# Allegro board minicar-v2.brd
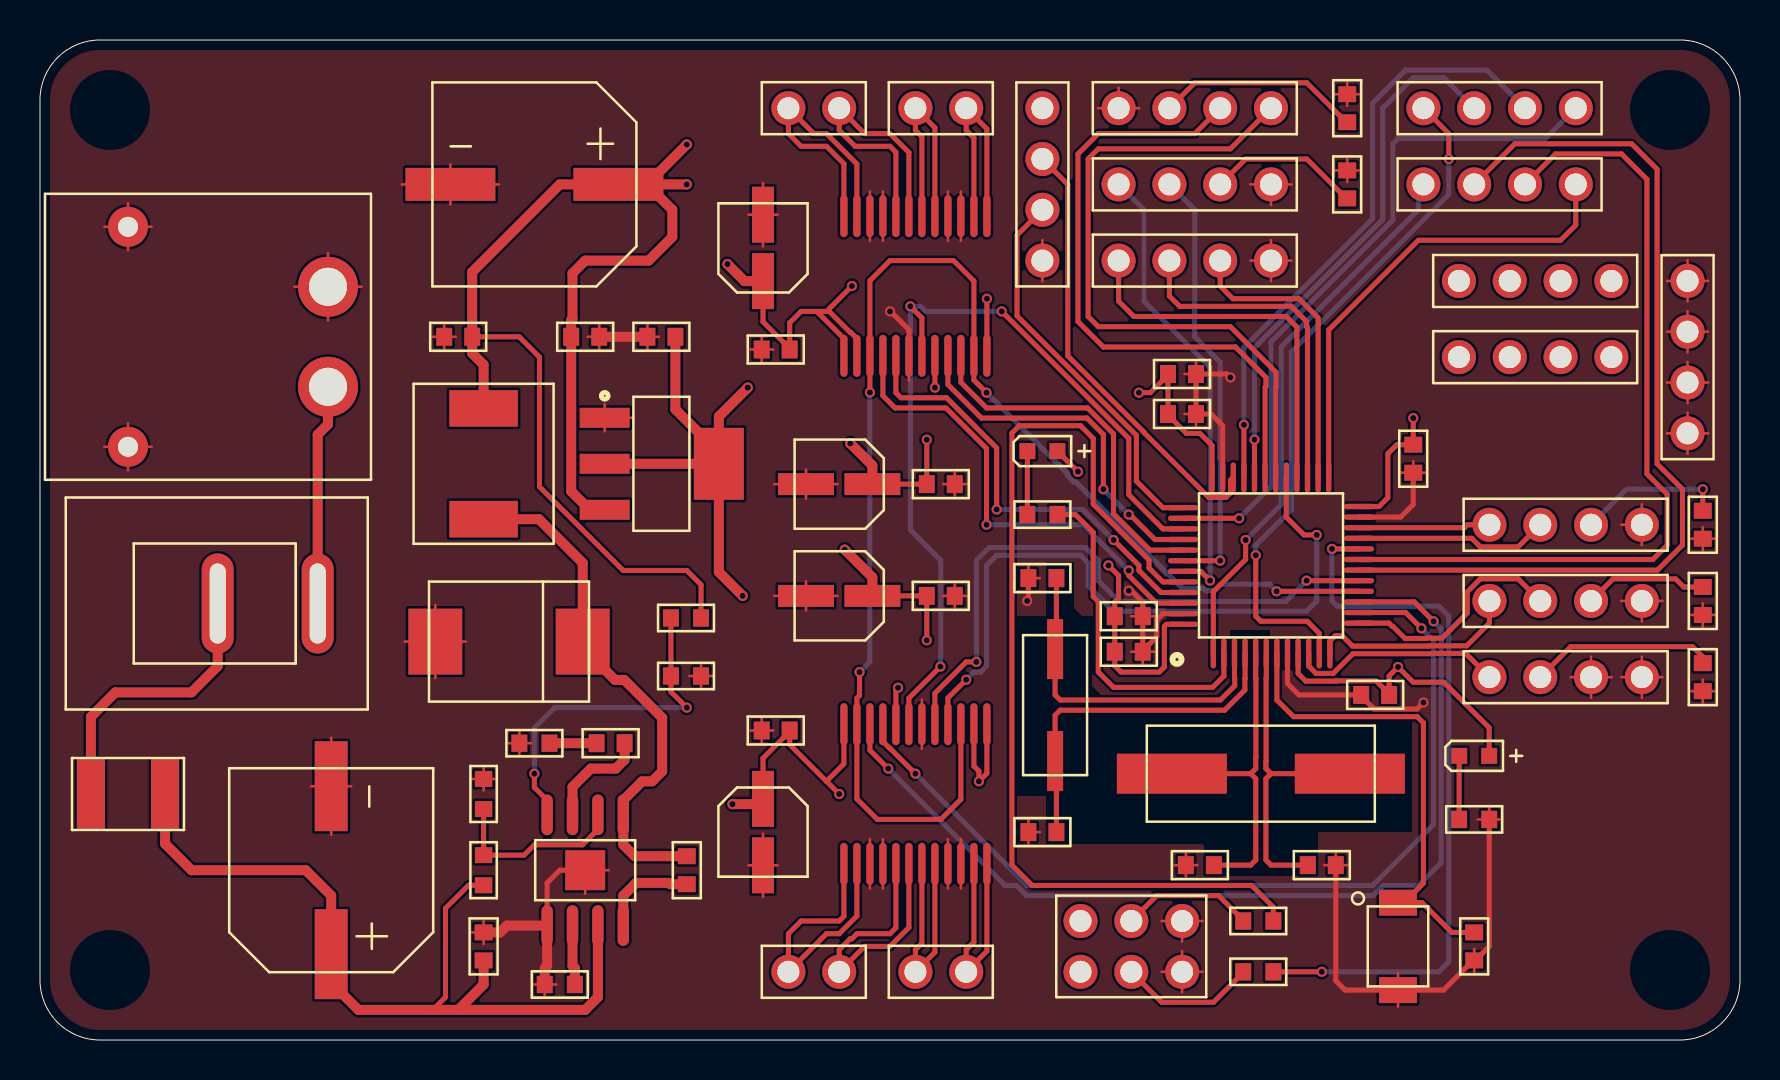
[diagram p0: board, top side]
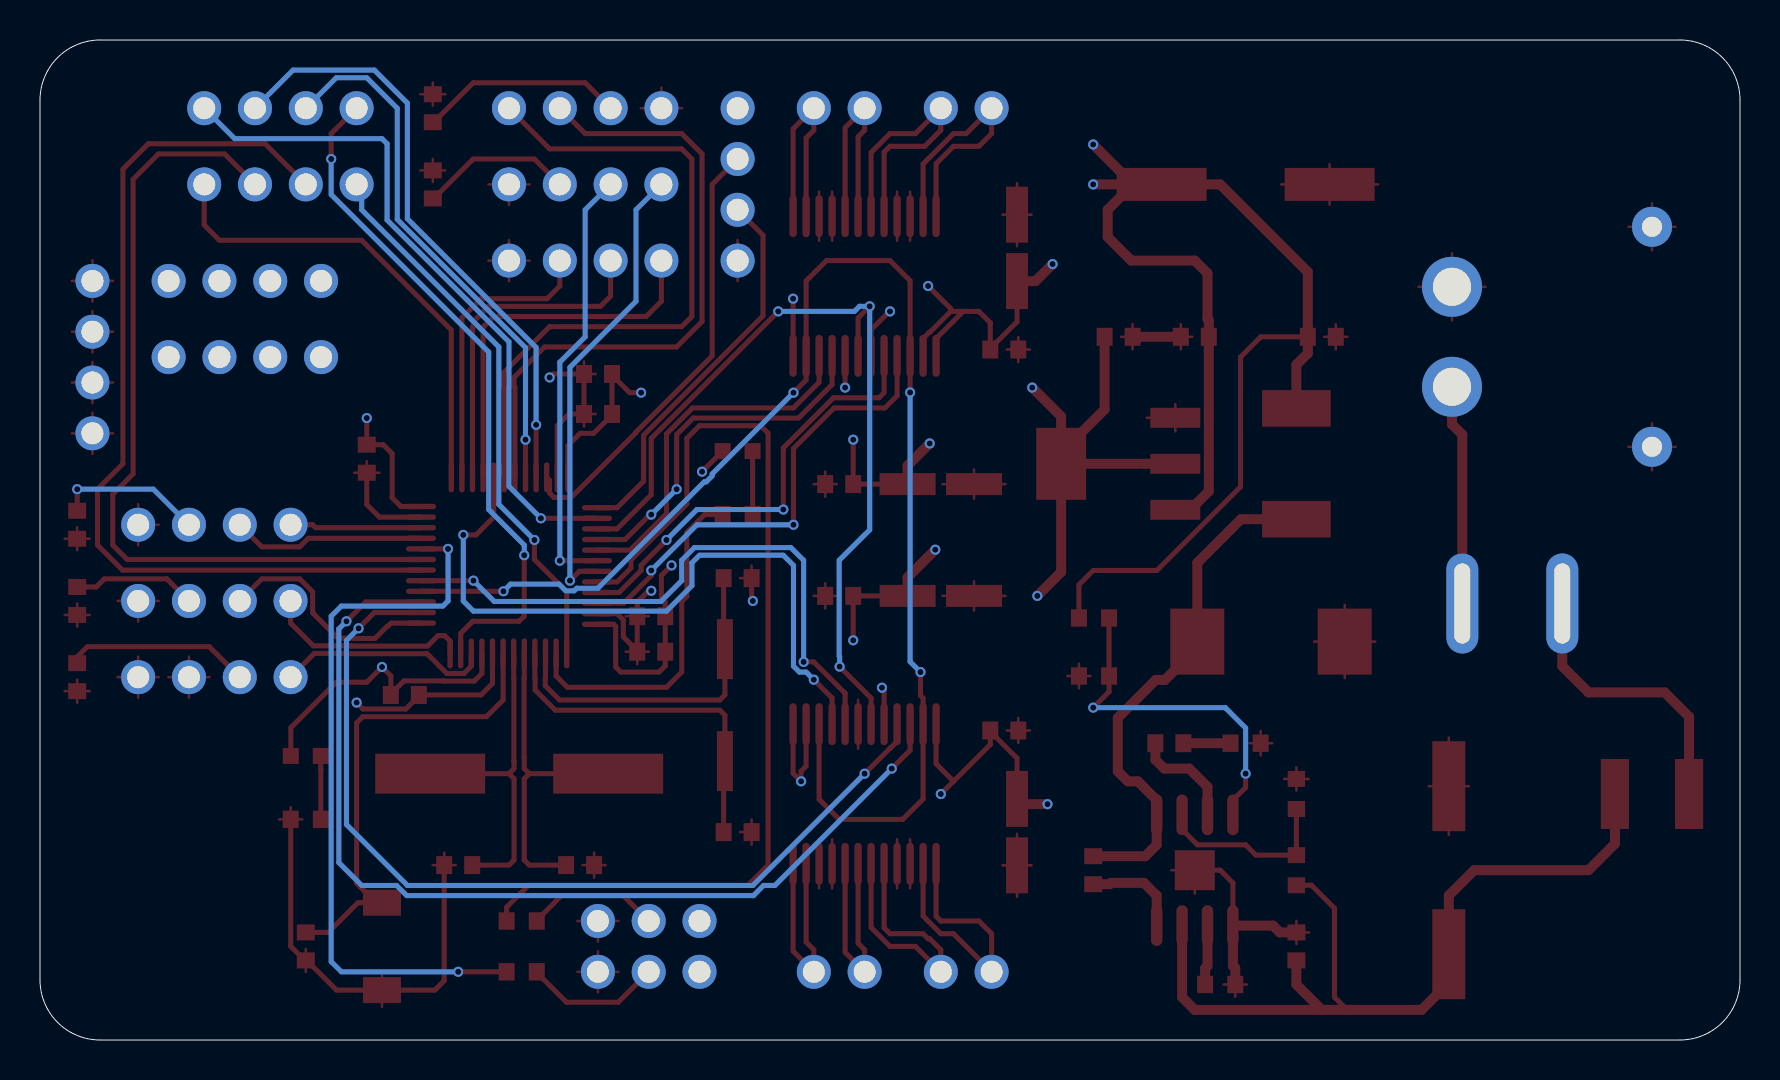
[diagram p1: board, bottom side, seen from below]

Outline 85 x 50 mm; copper layers: TOP, GND, POWER, BOTTOM. Coordinates in mm from the lower left corner of the outline.
Outline path: 0,47 0,3 arc(0.88,0.88) 3,0 82,0 arc(84.12,0.88) 85,3 85,47 arc(84.12,49.12) 82,50 3,50 arc(0.88,49.12) 0,47

## Design rules (mm)
constraint set DEFAULT: min track width 0.127
net group DP1_8MHZ: nets OSC_IN OSC_OUT
net group DP1_32KHZ: nets PC14 PC15

## Placement (name value [footprint] x y rotation side)
C1  22pF,16V  [C0603]  50.12 23.09 0 top
C2  22pF,16V  [C0603]  50.12 10.39 0 top
C3  22pF,16V  [C0603]  57.99 8.74 0 top
C4  22pF,16V  [C0603]  64.09 8.74 180 top
C5  4.7uF,16V  [C0603]  57.1 33.3 180 top
C6  100nF,16V  [C0603]  54.44 19.41 180 top
C7  100nF,16V  [C0603]  71.71 4.68 90 top
C8  100nF,16V  [C0603]  57.1 31.3 180 top
C9  10nF,16V  [C0603]  54.44 21.19 180 top
C10  1uF,16V  [C0603]  66.76 17.25 0 top
C11  100nF,16V  [C0603]  68.66 29.06 90 top
C12  100uF,50V  [C0603]  32.34 8.49 270 top
C13  220uF, 50V  [CP_D10XL10R2]  14.56 8.49 90 top
C14  10uF,50V  [C0603]  22.18 4.68 270 top
C15  22uF,50V  [C0603]  20.91 35.16 180 top
C16  220uF, 50V  [CP_D10XL10R2]  24.72 42.78 180 top
C17  150pF,50V  [C0603]  28.53 14.84 180 top
C18  4.7uF,50V  [C0603]  31.07 35.16 180 top
C19  1uF,50V  [C0603]  27.26 35.16 180 top
C20  100nF,16V  [C0603]  36.78 34.52 0 top
C21  100nF,16V  [C0603]  45.04 27.79 180 top
C22  10uF, 16V  [CP_D4XL54]  36.15 39.61 90 top
C23  10uF, 16V  [CP_D4XL54]  39.96 27.79 180 top
C24  100nF,16V  [C0603]  36.78 15.47 0 top
C25  100nF,16V  [C0603]  45.04 22.21 180 top
C26  10uF, 16V  [CP_D4XL54]  36.15 10.39 270 top
C27  10uF, 16V  [CP_D4XL54]  39.96 22.21 180 top
C28  100nF,16V  [C0603]  65.36 46.59 270 top
C29  100nF,16V  [C0603]  83.14 18.14 90 top
C30  100nF,16V  [C0603]  83.14 21.95 90 top
C31  100nF,16V  [C0603]  65.36 42.78 270 top
C32  100nF,16V  [C0603]  83.14 25.76 90 top
D1  LED  [LED0603]  71.71 14.21 0 top
D2  LED  [LED0603]  50.12 29.45 0 top
D3  SS34  [DO214AB]  23.45 19.92 180 top
F1  SMD1812-150-33 (3A)  [SMD1812]  4.4 12.3 0 top
J1  HEADER 4  [HDR4_P254]  50.12 42.78 90 top
J2  HEADER 3X2  [HDR3X2_P254]  54.56 4.68 0 top
J3  HEADER 4  [HDR4_P254]  72.98 46.59 0 top
J4  HEADER 4  [HDR4_P254]  72.98 42.78 0 top
J5  HDR_3V3  [HDR4_P254]  74.76 37.95 0 top
J6  HDR_5V  [HDR4_P254]  74.76 34.14 0 top
J7  HDR_GND  [HDR4_P254]  82.38 34.14 270 top
J8  HEADER 2  [HDR2_P254]  45.04 46.59 180 top
J9  HEADER 2  [HDR2_P254]  38.69 46.59 180 top
J10  HEADER 2  [HDR2_P254]  38.69 3.41 0 top
J11  HEADER 2  [HDR2_P254]  45.04 3.41 0 top
J12  HDR_USART1  [HDR4_P254]  57.74 46.59 180 top
J13  HDR_USART2  [HDR4_P254]  76.28 21.95 0 top
J14  HDR_SERVO  [HDR4_P254]  76.28 18.14 0 top
J15  HDR_I2C1  [HDR4_P254]  57.74 42.78 180 top
J16  HDR_I2C2  [HDR4_P254]  76.28 25.76 180 top
J17  HDR_SPI2  [HDR4_P254]  57.74 38.97 0 top
L1  10uH,3A  [H0630]  22.18 28.81 90 top
R1  10K  [R0603]  60.91 3.41 180 top
R2  10K  [R0603]  60.91 5.95 0 top
R3  510R  [R0603]  71.71 11.03 0 top
R4  510R  [R0603]  50.12 26.27 0 top
R5  100K  [R0603]  22.18 8.49 270 top
R6  100K  [R0603]  22.18 12.3 270 top
R7  100K  [R0603]  25.99 2.77 0 top
R8  210K 1%  [R0603]  32.3 21.1 180 top
R9  100K  [R0603]  24.72 14.84 0 top
R10  40R2K 1%  [R0603]  32.3 18.2 0 top
SW1  SW_PB_SPST  [SW_PB_4X3]  67.9 4.68 90 top
SW2  -  [KCD11-2P]  11.39 21.82 180 top
U1  STM32F103C8T6  [LQFP_48]  61.55 23.73 0 top
U2  -  [XT30]  4.4 35.16 90 top
U3  MP1584EN  [SOIC-8-EP]  27.26 8.49 180 top
U4  LDL1117_33R  [SOT223]  31.07 28.81 180 top
U5  TB6612FNG  [SSOP24]  43.77 37.7 180 top
U6  TB6612FNG  [SSOP24]  43.77 12.3 0 top
Y1  32.768kHz  [SMD_32KHZ]  50.76 16.74 90 top
Y2  8MHz  [SMD_8MHZ]  61.04 13.32 180 top

## Library data of the parts
C1-C12 C14 C15 C17-C21 C24 C25 C28-C32 = CAP NP
C13 C16 C22 C23 C26 C27 = CAP POL
D1 D2 = LED
D3 = DIODE
F1 = FUSE
J1 J3-J7 J12-J17 = HEADER 4
J2 = HEADER 3X2
J8-J11 = HEADER 2
L1 = INDUCTOR
R1-R10 = R2
SW1 = SW_PB_SPST
SW2 = SW SPST
U1 = STM32F103C8T6
U2 = XT30
U3 = MP1584EN
U4 = LDL1117_33R
U5 U6 = TB6612FNG
Y1 Y2 = CRYSTAL

## Footprints (pads in the part's own frame, mm; a bottom-side part is the same pattern mirrored in y, then rotated)
C0603
  rect 0.8x0.9 smd: 1(-0.7,0) 2(0.7,0)
CP_D4XL54
  rect 2.8x1.1 smd: 1(-1.66,0) 2(1.66,0)
CP_D10XL10R2
  rect 4.5x1.65 smd: 1(-4.2,0) 2(4.2,0)
DO214AB
  rect 2.7x3.3 smd: 1(-3.686,0) 2(3.686,0)
H0630
  rect 1.83x3.43 smd: 1(-2.77,0) 2(2.77,0)
HDR2_P254
  round 1.7 hole 1.1: 1(-1.27,0) 2(1.27,0)
HDR3X2_P254
  round 1.7 hole 1.1: 1(-2.54,1.27) 2(-2.54,-1.27) 3(0,1.27) 4(0,-1.27) 5(2.54,1.27) 6(2.54,-1.27)
HDR4_P254
  round 1.7 hole 1.1: 1(-3.81,0) 2(-1.27,0) 3(1.27,0) 4(3.81,0)
KCD11-2P
  oval 1.6x5 hole 0.8x4 unplated: (-2.5,0) (2.5,0)
LED0603
  rect 0.8x0.8 smd: 1(-0.749,0) 2(0.749,0)
LQFP_48
  oval 0.27x1.5 smd: 1(-2.885,-4.4) 2(-2.355,-4.4) 3(-1.825,-4.4) 4(-1.295,-4.4) 5(-0.765,-4.4) 6(-0.235,-4.4) 7(0.295,-4.4) 8(0.825,-4.4) 9(1.355,-4.4) 10(1.885,-4.4) 11(2.415,-4.4) 12(2.945,-4.4) 25(2.885,4.4) 26(2.355,4.4) 27(1.825,4.4) 28(1.295,4.4) 29(0.765,4.4) 30(0.235,4.4) 31(-0.295,4.4) 32(-0.825,4.4) 33(-1.355,4.4) 34(-1.885,4.4) 35(-2.415,4.4) 36(-2.945,4.4)
  oval 1.5x0.27 smd: 13(4.4,-2.885) 14(4.4,-2.355) 15(4.4,-1.825) 16(4.4,-1.295) 17(4.4,-0.765) 18(4.4,-0.235) 19(4.4,0.295) 20(4.4,0.825) 21(4.4,1.355) 22(4.4,1.885) 23(4.4,2.415) 24(4.4,2.945) 37(-4.4,2.885) 38(-4.4,2.355) 39(-4.4,1.825) 40(-4.4,1.295) 41(-4.4,0.765) 42(-4.4,0.235) 43(-4.4,-0.295) 44(-4.4,-0.825) 45(-4.4,-1.355) 46(-4.4,-1.885) 47(-4.4,-2.415) 48(-4.4,-2.945)
R0603
  rect 0.8x0.87 smd: 1(-0.753,0) 2(0.753,0)
SMD1812
  rect 1.407x3.499 smd: 1(-1.853,0) 2(1.853,0)
SMD_8MHZ
  rect 5.5x2 smd: 1(-4.45,0) 2(4.45,0)
SMD_32KHZ
  rect 3x0.8 smd: 1(-2.8,0) 2(2.8,0)
SOIC-8-EP
  oval 0.574x2.038 smd: 1(-1.905,-2.769) 2(-0.635,-2.769) 3(0.635,-2.769) 4(1.905,-2.769) 5(1.905,2.769) 6(0.635,2.769) 7(-0.635,2.769) 8(-1.905,2.769)
  rect 2x2 smd: 9(0,0)
SOT223
  rect 2.5x1 smd: 1(2.835,-2.3) 2(2.835,0) 3(2.835,2.3)
  rect 2.5x3.6 smd: 4(-2.873,0)
SSOP24
  oval 0.37x2.1 smd: 1(-3.575,-3.491) 2(-2.925,-3.491) 3(-2.275,-3.491) 4(-1.625,-3.491) 5(-0.975,-3.491) 6(-0.325,-3.491) 7(0.325,-3.491) 8(0.975,-3.491) 9(1.625,-3.491) 10(2.275,-3.491) 11(2.925,-3.491) 12(3.575,-3.491) 13(3.575,3.491) 14(2.925,3.491) 15(2.275,3.491) 16(1.625,3.491) 17(0.975,3.491) 18(0.325,3.491) 19(-0.325,3.491) 20(-0.975,3.491) 21(-1.625,3.491) 22(-2.275,3.491) 23(-2.925,3.491) 24(-3.575,3.491)
SW_PB_4X3
  rect 1.3x1.9 smd: 1(-2.185,0) 2(2.185,0)
XT30
  round 3 hole 1.9: 1(2.5,-10) 2(-2.5,-10)
  round 2 hole 1: 3(5.5,0) 4(-5.5,0)

## Nets
GND: C1.1 C2.1 C3.1 C4.1 C5.1 C6.1 C7.1 C8.1 C9.1 C10.1 C11.1 C13.2 C14.1 C15.2 C16.2 C18.2 C19.1 C20.1 C21.1 C22.2 C23.2 C24.1 C25.1 C26.2 C27.2 C28.1 C29.1 C30.1 C31.1 C32.1 D3.2 J1.1 J2.5 J2.6 J7.1 J7.2 J7.3 J7.4 J12.4 J13.4 J14.3 J14.4 J15.1 J16.1 J17.4 R3.2 R6.1 R7.1 R9.1 R10.2 SW1.1 U1.8 U1.23 U1.35 U1.47(VSS_3) U2.1 U2.3 U2.4 U3.5 U3.9 U4.1 U5.3 U5.4 U5.9 U5.10 U5.18 U6.3 U6.4 U6.9 U6.10 U6.18
VBAT: J4.1 U1.1
VCC3V3: C5.2 C6.2 C8.2 C9.2 C10.2 C11.2 C18.1 C30.2 C31.2 C32.2 D1.2 D2.2 J1.4 J2.1 J2.2 J5.1 J5.2 J5.3 J5.4 J13.3 J15.2 J16.2 U1.9 U1.24 U1.36 U1.48 U4.2 U4.4(VOUT2)
VCC5V: C15.1 C16.1 C19.2 C20.2 C21.2 C22.1 C23.1 C24.2 C25.2 C26.1 C27.1 C28.2 C29.2 J6.1 J6.2 J6.3 J6.4 J12.3 J14.2 L1.2 R8.1 U4.3 U5.13 U5.14(VM3) U5.20 U5.24 U6.13 U6.14(VM3) U6.20 U6.24
VIN_BAT: C13.1 C14.2 F1.2 R5.2 U3.7(VIN)
BOOT0: R2.2 U1.44
BOOT1: R1.1 U1.20
I2C1_SCL: J15.3 U1.42
I2C1_SDA: J15.4 U1.43
I2C2_SCL: J16.3 U1.21
I2C2_SDA: J16.4 U1.22
MOTORIC1_AIN1: U1.40 U5.21
MOTORIC1_AIN2: U1.41 U5.22
MOTORIC1_BIN1: U1.45 U5.17
MOTORIC1_BIN2: U1.46 U5.16
MOTORIC2_AIN1: U1.14 U6.21
MOTORIC2_AIN2: U1.15 U6.22
MOTORIC2_BIN1: U1.17 U6.17
MOTORIC2_BIN2: U1.29 U6.16
MOTORIC_STBY: U1.39 U5.19 U6.19
OSC_IN: C3.2 U1.5 Y2.2
OSC_OUT: C4.2 U1.6 Y2.1
PA1: J3.1 U1.11
PA11: J3.2 U1.32
PA12: J3.3 U1.33
PA15: J3.4 U1.38
PB0: J4.2 U1.18
PB1: J4.3 U1.19
PB12: J4.4 U1.25
PC13: R4.2 U1.2
PC14: C1.2 U1.3 Y1.2
PC15: C2.2 U1.4 Y1.1
RESET: C7.2 SW1.2 U1.7
SPI2_MISO: J17.2 U1.27
SPI2_MOSI: J17.1 U1.28
SPI2_SCK: J17.3 U1.26
SWCLK: J1.2 U1.37
SWDIO: J1.3 U1.34
TIM2_PWM: J14.1 U1.10
TIM3_PWM: U1.16 U5.15 U5.23 U6.15 U6.23
USART1_RX: J12.2 U1.31
USART1_TX: J12.1 U1.30
USART2_RX: J13.2 U1.13
USART2_TX: J13.1 U1.12
N13546: J8.1 U5.1 U5.2
N13563: J8.2 U5.5 U5.6
N13598: J9.1 U5.7 U5.8
N13619: J9.2 U5.11 U5.12
N15223: J10.1 U6.1 U6.2
N15263: J10.2 U6.5 U6.6
N15407: J11.1 U6.7 U6.8
N15519: J11.2 U6.11 U6.12
N31972: C12.2 U3.8
N31979: C12.1 D3.1(K) L1.1 U3.1
N32592: R7.2 U3.6
N32821: R5.1 R6.2 U3.2
N35796: C17.1 U3.3
N36210: C17.2 R9.2
N38494: R8.2 R10.1 U3.4
N053341: J2.4 R1.2
N053344: J2.3 R2.1
N066431: D1.1(CATHODE) R3.1
N066591: D2.1(CATHODE) R4.1
N113201: U2.2
N288331: F1.1

## Via types
v1: diameter 0.508, hole 0.305, TOP to BOTTOM, 60 vias

## Routing (per net, layer and track width the routed paths; a pad name or vN(x,y) marks a point on that pad's centre or on a via; arc(x,y) is an arc through that point)
GND: length 335.5
  TOP w0.127: 67.9,1.67 SW1.1 67.9,3.32 ; 45.16,27.79 C21.1 ; C21.1 45.74,28.42 ; C21.1 45.74,27.17 ; C21.1 46.32,27.79 ; 82.38,31.85 J7.3 ; J7.3 82.38,33.9 ; J7.3 81.35,32.87 ; J7.3 83.41,32.87 ; 45.4,10.04 U6.9 45.4,7.58 ; C19.1 27.96,35.79 ; C19.1 27.96,34.53 ; C19.1 27.38,35.16 ; 23.39,14.84 R9.1 ; R9.1 23.97,15.45 ; R9.1 23.97,14.23 ; R9.1 24.55,14.84 ; 50.12,40 J1.1 50.12,37.94 ; J7.4 83.41,30.33 ; J7.4 81.35,30.33 ; J7.4 82.38,29.31 ; J7.4 82.38,31.36 ; C6.1 55.72,19.41 ; C6.1 55.14,18.78 ; C6.1 54.56,19.41 ; 61.55,41.75 J15.1 ; J15.1 62.58,42.78 ; J15.1 60.52,42.78 ; C20.1 36.66,34.52 ; C20.1 35.51,34.52 ; C20.1 36.09,33.9 ; C20.1 36.09,35.15 ; C11.1 69.29,28.36 ; C11.1 68.66,28.94 ; C11.1 68.03,28.36 ; 18.24,19.92 D3.2 ; D3.2 19.76,18.09 ; D3.2 19.76,21.75 ; D3.2 21.29,19.92 ; 56.08,3.41 J2.6 ; J2.6 58.13,3.41 ; J2.6 57.11,2.38 ; J2.6 57.11,4.44 ; 43.45,32.98 U5.18 ; 36.15,7.16 C26.2 ; C26.2 36.15,10.31 ; C26.2 35.42,8.73 ; C26.2 36.88,8.73 ; 32.48,18.2 R10.2 ; R10.2 33.05,18.81 ; R10.2 33.63,18.2 ; R10.2 33.05,17.59 ; 41.49,39.96 U5.10 41.49,42.42 ; 82.38,36.93 J7.1 ; J7.1 81.35,37.95 ; J7.1 83.41,37.95 ; J7.1 82.38,38.98 ; 54.56,21.19 C9.1 55.72,21.19 ; C2.1 49.42,11.02 ; C2.1 50,10.39 ; C2.1 49.42,9.77 ; 57.22,31.3 C8.1 57.8,30.67 ; C15.2 20.21,35.79 ; C15.2 20.21,34.53 ; C15.2 19.63,35.16 ; C15.2 20.79,35.16 ; 57.8,33.93 C5.1 57.22,33.3 ; 80.09,24.73 J16.1 ; J16.1 79.06,25.76 ; J16.1 80.09,26.79 ; 41.49,7.58 U6.3 41.49,10.04 ; 64.21,8.74 C4.1 ; C4.1 64.79,9.37 ; C4.1 65.37,8.74 ; 22.18,12.47 R6.1 ; R6.1 21.57,13.05 ; R6.1 22.79,13.05 ; R6.1 22.18,13.63 ; C16.2 22.95,42.78 ; C16.2 20.52,41.78 ; C16.2 18.09,42.78 ; C16.2 20.52,43.78 ; 71.71,4.56 C7.1 71.71,3.4 ; 3.22,29.66 U2.4 ; U2.4 5.58,29.66 ; U2.4 4.4,28.48 ; U2.4 4.4,30.84 ; C14.1 22.18,5.96 ; C14.1 22.18,4.8 ; C14.1 21.55,5.38 ; 14.56,10.26 C13.2 ; C13.2 15.56,12.69 ; C13.2 13.56,12.69 ; C13.2 14.56,15.12 ; C22.2 36.15,42.84 ; C22.2 35.42,41.27 ; C22.2 36.15,39.69 ; C22.2 36.88,41.27 ; 57.29,8.12 C3.1 ; C3.1 57.29,9.37 ; C3.1 57.87,8.74 ; C3.1 56.72,8.74 ; 82.51,25.06 C32.1 ; C32.1 83.14,24.48 ; C32.1 83.14,25.64 ; C32.1 83.77,25.06 ; 42.15,42.42 42.15,39.96 ; 25.24,2.16 R7.1 ; R7.1 24.66,2.77 ; R7.1 25.82,2.77 ; R3.2 72.46,11.64 ; R3.2 71.89,11.03 ; R3.2 73.04,11.03 ; J17.4 62.58,38.97 ; J17.4 61.55,37.94 ; J17.4 61.55,40 ; J17.4 60.52,38.97 ; 14.4,35.98 U2.1 ; U2.1 14.4,39.34 ; U2.1 16.08,37.66 ; U2.1 12.72,37.66 ; 77.55,17.11 J14.3 ; J14.3 78.58,18.14 ; J14.3 77.55,19.17 ; J14.3 76.52,18.14 ; J14.4 81.12,18.14 ; J14.4 80.09,17.11 ; J14.4 80.09,19.17 ; J14.4 79.06,18.14 ; 38.3,27.07 C23.2 ; C23.2 39.88,27.79 ; C23.2 36.72,27.79 ; C23.2 38.3,28.52 ; 49.42,23.72 C1.1 50,23.09 ; 45.16,22.21 C25.1 ; C25.1 46.32,22.21 ; C25.1 45.74,21.58 ; C25.1 45.74,22.83 ; C30.1 83.77,21.25 ; C30.1 83.14,21.83 ; C30.1 82.51,21.25 ; C30.1 83.14,20.67 ; C24.1 36.66,15.47 ; C24.1 36.09,16.1 ; C24.1 35.51,15.47 ; C24.1 36.09,14.85 ; 46.05,10.04 U6.10 46.05,7.58 ; C18.2 30.37,35.79 ; C18.2 30.95,35.16 ; C18.2 30.37,34.53 ; C29.1 83.77,17.44 ; C29.1 83.14,16.86 ; C29.1 83.14,18.02 ; C29.1 82.51,17.44 ; J7.2 83.41,35.41 ; J7.2 82.38,36.44 ; J7.2 81.35,35.41 ; J7.2 82.38,34.39 ; 64.73,43.48 C31.1 ; C31.1 65.36,42.9 ; C31.1 65.99,43.48 ; C31.1 65.36,44.06 ; 46.05,39.96 46.05,42.42 ; J12.4 53.93,47.62 ; J12.4 52.9,46.59 ; J12.4 54.96,46.59 ; J13.4 81.12,21.95 ; J13.4 80.09,20.92 ; J13.4 79.06,21.95 ; U4.1 28.23,31.79 ; U4.1 28.23,30.43 ; U4.1 29.66,31.11 ; 65.36,46.71 C28.1 ; C28.1 65.99,47.29 ; C28.1 65.36,47.87 ; C28.1 64.73,47.29 ; 56.08,5.95 J2.5 ; J2.5 58.13,5.95 ; J2.5 57.11,4.92 ; 4.4,39.48 U2.3 ; U2.3 3.22,40.66 ; U2.3 5.58,40.66 ; U2.3 4.4,41.84 ; 36.72,22.21 C27.2 ; C27.2 38.3,21.48 ; C27.2 39.88,22.21 ; C27.2 38.3,22.93 ; 44.09,14.56 U6.18 44.09,17.02 ; 42.15,7.58 U6.4 42.15,10.04 ; 28.44,8.49 U3.9 27.26,7.31 ; 45.4,39.96 U5.4 45.4,42.42
  TOP w0.254: U1.23 68.03,26.14 68.66,26.78 C11.1 ; U5.18 43.45,35.51 42.53,36.43 v1(42.5,36.43) ; U1.35 59.14,30.72 58.55,31.3 C8.1 C5.1 59.35,33.3 v1(59.52,33.13) ; 55.14,19.46 C9.1 55.14,21.89 54.57,22.46 v1(54.44,22.46) ; 55.14,19.46 C6.1 ; 55.14,19.46 55.84,20.16 55.84,21 56.15,21.32 U1.47 ; v1(49.36,21.95) 49.42,22.01 C1.1 ; U3.9 25.99,8.49 25.36,7.86 U3.5 ; R3.2 72.46,4.68 71.76,3.98 C7.1 71.66,3.98 70.17,2.5 SW1.1 65.26,2.5 64.79,2.96 C4.1 ; U1.8 62.38,17.82 62.95,17.25 66.06,17.25 66.06,17.2 66.71,16.55 68.85,16.55 v1(69.17,16.87)
  TOP w0.5: C19.1 C18.2 ; R7.1 25.24,3.59 25.36,3.7 U3.5 23.35,5.72 23.01,5.38 C14.1
  GND w0.127: J7.3 83.41,32.87 ; J7.3 82.38,33.9 ; J7.3 81.35,32.87 ; J7.3 82.38,31.85 ; U2.4 5.58,29.66 ; U2.4 3.22,29.66 ; U2.4 4.4,30.84 ; U2.4 4.4,28.48 ; 80.09,20.92 J13.4 ; J13.4 81.12,21.95 ; J13.4 80.09,22.98 ; J13.4 79.06,21.95 ; U2.3 5.58,40.66 ; U2.3 4.4,41.84 ; U2.3 4.4,39.48 ; U2.3 3.22,40.66 ; J7.4 82.38,31.36 ; J7.4 81.35,30.33 ; J7.4 82.38,29.31 ; J7.4 83.41,30.33 ; 61.55,41.75 J15.1 ; J15.1 60.52,42.78 ; J15.1 62.58,42.78 ; J15.1 61.55,43.81 ; J7.1 83.41,37.95 ; J7.1 81.35,37.95 ; J7.1 82.38,38.98 ; J7.1 82.38,36.93 ; U2.1 14.4,39.34 ; U2.1 16.08,37.66 ; U2.1 14.4,35.98 ; U2.1 12.72,37.66 ; 61.55,37.94 J17.4 ; J17.4 62.58,38.97 ; J17.4 61.55,40 ; J17.4 60.52,38.97 ; J7.2 82.38,36.44 ; J7.2 82.38,34.39 ; J7.2 81.35,35.41 ; J7.2 83.41,35.41 ; J2.5 57.11,6.98 ; J2.5 58.13,5.95 ; J2.5 57.11,4.92 ; J2.5 56.08,5.95 ; 79.06,18.14 J14.4 ; J14.4 80.09,17.11 ; J14.4 81.12,18.14 ; J14.4 80.09,19.17 ; J16.1 80.09,26.79 ; J16.1 81.12,25.76 ; J16.1 80.09,24.73 ; J16.1 79.06,25.76 ; 76.52,18.14 J14.3 ; J14.3 78.58,18.14 ; J14.3 77.55,19.17 ; J14.3 77.55,17.11 ; J12.4 54.96,46.59 ; J12.4 53.93,47.62 ; J12.4 53.93,45.56 ; J12.4 52.9,46.59 ; 49.09,38.97 J1.1 ; J1.1 50.12,40 ; J1.1 50.12,37.94 ; J1.1 51.15,38.97 ; J2.6 57.11,4.44 ; J2.6 57.11,2.38 ; J2.6 58.13,3.41 ; J2.6 56.08,3.41
  GND w0.254: v1(69.17,16.87) 69.17,18.14 ; v1(42.5,36.43) 42.5,37.19 ; v1(49.36,21.95) 47.83,21.95 ; v1(59.52,33.13) 59.52,32.11
VBAT: length 27.8
  TOP w0.254: v1(60.28,25) 60.28,24.03 58.66,22.41 U1.1
  BOTTOM w0.254: J4.1 68.92,42.53 68.92,41.51 62.06,34.65 62.06,26.78 v1(60.28,25)
VCC3V3: length 256.2
  TOP w0.254: v1(54.95,32.37) 55.52,32.37 56.4,33.25 ; 56.4,33.25 C8.2 56.4,31.25 57.32,30.33 57.99,30.33 58.61,29.72 U1.36 ; 56.4,33.25 C5.2 ; D1.2 72.46,15.62 70.19,17.89 68.66,17.89 v1(67.9,18.65) 67.46,18.21 67.46,17.3 ; 67.46,17.3 66.8,17.96 64.83,17.96 64.81,17.95 63.29,17.95 62.91,18.33 U1.9 ; 67.46,17.3 C10.2 ; v1(68.66,31.1) C11.2 67.84,29.76 67.39,29.32 67.39,27.11 66.95,26.68 65.95,26.68 ; v1(53.42,23.73) 53.93,23.22 53.93,22.09 53.74,21.89 C9.2 C6.2 53.74,18.71 54.05,18.4 55.96,18.4 56.22,18.65 56.22,20.68 56.32,20.79 U1.48 ; J13.3 78.66,23.06 81.78,23.06 82.19,22.65 C30.2 ; D2.2 v1(51.9,28.42) ; J15.2 60.28,44.05 63.34,44.05 65.31,42.08 C31.2 ; C32.2 v1(83.14,27.54)
  TOP w0.5: U4.2 U4.4 ; U4.4 33.94,23.4 v1(35.13,22.21) ; U4.4 33.94,29.36 ; C18.1 31.77,31.53 33.94,29.36 ; 33.94,29.36 33.94,31.18 v1(35.39,32.62)
  POWER w0.254: 54.18,33.89 54.95,33.13 v1(54.95,32.37) ; v1(68.66,31.1) 68.66,31.86 66.63,33.89 ; v1(51.9,28.42) 51.9,31.86 49.87,33.89
  POWER w0.5: 62.31,33.89 49.1,33.89 ; 62.31,33.89 63.84,35.41 63.84,40.24 63.33,40.75 61.04,40.75 J15.2 ; 62.31,33.89 66.88,33.89 ; v1(53.42,23.73) 52.15,25 42.68,25 41.03,23.35 36.28,23.35 v1(35.13,22.21) 38.44,18.9 38.44,7.73 39.2,6.97 51.01,6.97 J2.1 J2.2 ; 49.1,33.89 36.66,33.89 v1(35.39,32.62) ; 49.1,33.89 51.64,36.43 51.64,45.07 J1.4 ; 66.88,33.89 J5.1 J5.2 J5.3 J5.4 ; 66.88,33.89 68.41,33.89 70.44,31.86 76.28,31.86 77.55,30.59 J16.2 J13.3 75.77,20.17 72.22,20.17 70.69,18.65 v1(67.9,18.65)
  BOTTOM w0.254: v1(83.14,27.54) 79.33,27.54 J16.2
VCC5V: length 312.6
  TOP w0.254: 37.48,15.43 37.48,14.77 39.32,12.94 ; 37.48,15.43 C24.2 ; 37.48,15.43 36.15,14.09 C26.1 ; U5.14 40.84,35.07 40.53,35.38 40.51,35.38 39.46,36.43 ; v1(47.34,37.06) 47.34,34.21 ; 38.84,36.43 40.2,35.07 40.2,34.21 ; 38.84,36.43 39.46,36.43 ; 38.84,36.43 38.05,36.43 37.48,35.86 37.48,34.58 ; C15.1 23.96,35.16 24.97,34.14 24.97,27.66 29.16,23.48 32.34,23.48 33.05,22.76 R8.1 ; J14.2 76.54,19.67 82.63,19.67 83.14,19.16 C29.2 ; 39.46,36.43 39.46,36.56 v1(40.59,37.7) ; C28.2 65.31,45.89 63.34,47.86 57.74,47.86 J12.3 ; 47.34,15.79 47.34,13.34 v1(46.95,12.94) 46.95,13.44 46.7,13.69 U6.14 ; 39.32,12.94 39.33,12.94 v1(39.96,12.3) ; 39.32,12.94 40.2,13.81 U6.24 ; v1(44.34,30.02) C21.2 C23.1 ; C27.1 C25.2 v1(44.34,19.98) ; U6.20 42.8,17.51 v1(42.9,17.61) ; 37.48,34.58 36.15,35.91 C22.1 ; 37.48,34.58 C20.2 ; v1(44.74,32.62) U5.20
  TOP w0.5: 30.34,42.78 v1(32.34,44.77) ; 30.34,42.78 C16.1 25.99,42.78 21.61,38.4 C15.1 21.61,34.33 22.18,33.76 L1.2 ; 30.34,42.78 v1(32.34,42.78) ; 30.34,42.78 31.62,41.51 31.62,40.15 30.44,38.97 27.26,38.97 26.62,38.34 26.62,36.05 26.56,35.99 C19.2 26.56,27.43 27.48,26.51 U4.3 ; C26.1 35.89,11.79 v1(34.63,11.79) ; C23.1 41.62,28.72 v1(40.52,29.83) ; C27.1 41.62,23.13 v1(40.24,24.52) ; v1(34.37,38.8) 35.22,37.95 C22.1
  POWER w0.254: v1(47.34,37.06) 46.71,37.7 v1(40.59,37.7) ; v1(46.95,12.94) 46.31,12.3 v1(39.96,12.3) ; v1(44.74,32.62) 44.34,32.22 v1(44.34,30.02) ; v1(44.34,19.98) 44.34,19.05 v1(42.9,17.61)
  POWER w0.5: 33.36,32.37 35.9,29.83 v1(40.52,29.83) ; 33.36,32.37 33.36,39.73 ; 33.36,32.37 33.36,26.02 ; v1(34.37,38.8) 34.29,38.8 33.36,39.73 ; 54.7,48.37 77.3,48.37 78.82,46.84 78.82,41.26 80.09,39.99 80.09,35.67 79.84,35.41 ; 54.7,48.37 55.2,47.87 55.2,47.86 J12.3 ; 54.7,48.37 35.93,48.37 v1(32.34,44.77) ; 33.36,39.73 33.36,41.76 v1(32.34,42.78) ; 79.84,35.41 J6.4 J6.3 J6.2 J6.1 ; 79.84,35.41 79.84,30.59 81.87,28.56 81.87,16.87 80.85,15.86 77.3,15.86 J14.2 ; 33.36,26.02 33.36,13.06 v1(34.63,11.79) ; 33.36,26.02 34.86,24.52 v1(40.24,24.52)
VIN_BAT: length 44.7
  TOP w0.254: R5.2 21.43,7.74 20.27,6.59 20.27,2.14 19.64,1.5
  TOP w0.5: 20.91,1.5 15.92,1.5 14.56,2.86 C13.1 14.56,7.22 13.29,8.49 7.58,8.49 6.25,9.81 F1.2 ; 20.91,1.5 27.26,1.5 27.89,2.14 U3.7 ; 20.91,1.5 22.18,2.77 C14.2
BOOT0: length 50.3
  TOP w0.254: R2.2 61.67,6.64 60.58,7.73 49.61,7.73 48.6,8.74 48.6,30.34 48.97,30.71 52.02,30.71 52.66,30.08 52.66,26.79 55.45,24 55.45,23.6 56.15,22.91 57.15,22.91
BOOT1: length 36.4
  TOP w0.254: v1(64.6,24.55) 65.95,24.55 ; R1.1 v1(64.09,3.41)
  BOTTOM w0.254: v1(64.09,3.41) 69.93,3.41 70.44,3.92 70.44,21.19 69.93,21.7 64.85,21.7 64.6,21.95 v1(64.6,24.55)
I2C1_SCL: length 21.7
  TOP w0.254: U1.42 v1(59.01,23.96)
  BOTTOM w0.254: v1(59.01,23.96) 59.01,33.89 57.74,35.16 57.74,41.51 J15.3
I2C1_SDA: length 23.3
  TOP w0.254: v1(58.5,22.97) 58.03,23.43 U1.43
  BOTTOM w0.254: J15.4 55.2,41.51 55.2,36.94 58.5,33.64 v1(58.5,22.97)
I2C2_SCL: length 9.7
  TOP w0.254: J16.3 73.91,24.66 72.01,24.66 71.59,25.09 U1.21
I2C2_SDA: length 6.6
  TOP w0.254: J16.4 71.37,25.76 71.22,25.61 U1.22
MOTORIC1_AIN1: length 18
  TOP w0.254: v1(54.44,26.27) 54.56,26.14 54.63,26.14 55.74,25.02 U1.40 ; v1(53.17,27.54) 53.17,30.27 52.34,31.1 47.07,31.1 45.4,32.77 45.4,34.21
  BOTTOM w0.254: v1(53.17,27.54) v1(54.44,26.27)
MOTORIC1_AIN2: length 18.2
  TOP w0.254: U5.22 46.05,32.88 47.33,31.6 52.38,31.6 53.68,30.3 53.68,26.31 55.49,24.5 U1.41
MOTORIC1_BIN1: length 22.3
  TOP w0.254: 42.8,34.21 42.8,32.37 43.05,32.11 45.32,32.11 47.83,29.6 v1(47.83,26.52) ; v1(53.68,25) 54.95,23.73 54.95,23.48 56.05,22.38 U1.45
  BOTTOM w0.254: v1(47.83,26.52) 52.15,26.52 v1(53.68,25)
MOTORIC1_BIN2: length 23.7
  TOP w0.254: v1(47.33,25.76) 47.33,29.57 45.29,31.6 42.75,31.6 42.15,32.21 U5.16 ; v1(54.44,23.48) 54.44,23.22 55.81,21.84 U1.46
  BOTTOM w0.254: v1(54.44,23.48) 52.15,25.76 v1(47.33,25.76)
MOTORIC2_AIN1: length 46.2
  TOP w0.254: v1(43.77,13.32) 42.47,14.62 42.46,14.62 42.15,14.93 U6.21 ; v1(69.07,20.58) 68.28,21.38 U1.14
  BOTTOM w0.254: v1(43.77,13.32) 49.36,7.73 66.63,7.73 69.68,10.78 69.68,19.98 v1(69.07,20.58)
MOTORIC2_AIN2: length 49.9
  TOP w0.254: U6.22 41.49,14.49 v1(42.41,13.57) ; v1(69.68,20.94) 68.71,21.91 65.95,21.91
  BOTTOM w0.254: v1(69.68,20.94) 70.06,20.55 70.06,8.87 68.92,7.73 67.17,7.73 66.66,7.22 49.33,7.22 48.82,7.73 48.25,7.73 v1(42.41,13.57)
MOTORIC2_BIN1: length 30.9
  TOP w0.254: U6.17 44.74,17.34 46.31,18.9 v1(46.82,18.9) ; U1.17 63.84,22.96 63.84,22.97 v1(63.33,22.97)
  BOTTOM w0.254: v1(63.33,22.97) 62.29,21.93 53.96,21.93 52.91,22.97 52.91,23.98 52.28,24.62 47.45,24.62 46.82,23.98 v1(46.82,18.9)
MOTORIC2_BIN2: length 34.9
  TOP w0.254: v1(46.31,18.02) 45.4,17.1 U6.16 ; U1.29 62.31,26.14 63.2,25.25 v1(63.84,25.25)
  BOTTOM w0.254: v1(63.84,25.25) 63.84,21.95 63.33,21.44 53.68,21.44 52.41,22.71 52.41,23.86 52.02,24.24 47.83,24.24 47.33,23.73 47.33,18.69 47.03,18.4 46.69,18.4 v1(46.31,18.02)
MOTORIC_STBY: length 44.8
  TOP w0.254: 57.15,25.55 56.15,25.55 54.44,27.26 54.44,30.08 v1(48.09,36.43) ; v1(43.52,36.68) 44.09,36.11 44.09,34.21 ; v1(45.02,18.67) 43.45,17.09 43.45,15.79
  BOTTOM w0.254: v1(48.09,36.43) 44.28,36.43 44.02,36.68 v1(43.52,36.68) 43.52,25.51 45.04,23.98 45.04,19.2 45.02,19.18 v1(45.02,18.67)
OSC_IN: length 16.7
  TOP w0.254: U1.5 60.78,18.08 60.8,18.07 60.8,14.15 60.79,14.14 60.79,13.57 60.53,13.32 ; 60.53,13.32 Y2.2 ; 60.53,13.32 60.79,13.06 60.79,9 60.53,8.74 C3.2
OSC_OUT: length 16.7
  TOP w0.254: C4.2 61.55,8.74 61.3,9 61.3,13.06 61.55,13.32 ; 61.55,13.32 Y2.1 ; 61.55,13.32 61.3,13.57 61.3,13.93 61.3,13.94 61.3,18.07 61.31,18.08 U1.6
PA1: length 34.5
  TOP w0.254: v1(70.44,44.05) 70.44,45.32 J3.1 ; U1.11 63.97,20.33 63.36,20.94 61.04,20.94 60.79,21.19 v1(60.79,24.24)
  BOTTOM w0.254: v1(70.44,44.05) 70.44,42.27 62.57,34.4 62.57,26.52 60.79,24.75 v1(60.79,24.24)
PA11: length 27
  TOP w0.254: U1.32 v1(60.73,30.02)
  BOTTOM w0.254: J3.2 70.19,48.11 68.66,48.11 67.14,46.59 67.14,41.03 60.73,34.62 v1(60.73,30.02)
PA12: length 30.5
  TOP w0.254: U1.33 v1(60.2,30.76)
  BOTTOM w0.254: v1(60.2,30.76) 60.2,34.63 66.63,41.06 66.63,46.84 68.28,48.5 72.34,48.5 J3.3
PA15: length 34.6
  TOP w0.254: U1.38 v1(59.96,26.09)
  BOTTOM w0.254: J3.4 75.27,45.07 67.9,45.07 67.65,44.81 67.65,41 61.55,34.91 61.55,27.68 v1(59.96,26.09)
PB0: length 46.5
  TOP w0.254: U1.18 80.87,23.5 82.12,24.75 82.12,27.54 80.85,28.81 80.85,43.54 79.58,44.81 73.74,44.81 J4.2
PB1: length 41.7
  TOP w0.254: U1.19 80.64,24.02 81.36,24.75 81.36,27.29 80.35,28.3 80.35,43.03 79.08,44.3 75.77,44.3 J4.3
PB12: length 23.9
  TOP w0.254: U1.25 64.44,35.51 68.92,39.99 76.03,39.99 76.79,40.75 J4.4
PC13: length 17.2
  TOP w0.254: R4.2 51.77,26.27 52.66,25.38 52.66,22.18 52.91,21.92 52.91,18.4 53.68,17.63 58.63,17.63 59.2,18.2 U1.2
PC14: length 16.9
  TOP w0.254: C1.2 50.82,19.61 Y1.2 50.76,17.25 51.01,17 59.02,17 59.74,17.71 59.74,18.07 59.73,18.08 U1.3
PC15: length 17.7
  TOP w0.254: U1.4 60.25,18.08 60.24,18.07 60.24,17.5 59.23,16.49 51.01,16.49 50.76,16.24 Y1.1 50.82,13.88 C2.2
RESET: length 23.9
  TOP w0.254: C7.2 70.59,5.38 69.1,6.86 68.2,6.86 ; 61.84,19.33 61.84,17 62.68,16.17 68.86,16.17 69.17,15.86 69.17,7.84 68.2,6.86 ; 68.2,6.86 SW1.2
SPI2_MISO: length 17
  TOP w0.254: J17.2 56.47,37.19 56.98,36.68 62.57,36.68 63.33,35.92 63.33,35.68 63.38,35.63 U1.27
SPI2_MOSI: length 19
  TOP w0.254: U1.28 62.84,35.63 62.82,35.66 62.82,35.67 62.31,36.18 54.69,36.18 53.93,36.94 J17.1
SPI2_SCK: length 14.8
  TOP w0.254: U1.26 63.91,36.11 62.95,37.06 59.64,37.06 59.01,37.7 J17.3
SWCLK: length 19.4
  TOP w0.254: J1.2 48.85,40.24 48.85,36.21 54.82,30.24 54.82,27.94 56.15,26.61 57.15,26.61
SWDIO: length 22.4
  TOP w0.254: U1.34 59.52,27.99 59.52,27.35 59.3,27.13 58.44,27.13 55.2,30.37 55.2,30.4 51.39,34.21 51.39,42.78 J1.3
TIM2_PWM: length 10.7
  TOP w0.254: J14.1 71.28,19.33 69.61,19.33 69.6,19.31 65.64,19.31 64.66,18.33 63.8,18.33 63.44,18.69 U1.10
TIM3_PWM: length 70.9
  TOP w0.254: v1(40.98,18.4) 40.98,17.23 40.84,17.09 40.84,12.05 41.87,11.03 45.04,11.03 46.05,12.04 U6.15 ; v1(47.33,32.37) 46.7,33 U5.23 46.7,37.95 45.67,38.97 42.5,38.97 41.49,37.97 v1(41.49,32.38) ; U1.16 v1(61.83,22.43)
  BOTTOM w0.254: v1(40.98,18.4) 41.49,18.91 v1(41.49,32.38) ; v1(61.83,22.43) 61.47,22.79 59.05,22.79 58.71,22.46 58.29,22.46 58.16,22.59 57.11,22.59 51.78,27.91 51.69,27.91 51.39,28.21 51.39,28.3 v1(47.33,32.37)
USART1_RX: length 32
  TOP w0.254: J12.2 57.74,45.32 52.91,45.32 51.9,44.3 51.9,35.92 53.17,34.65 59.77,34.65 61.3,33.13 61.3,32.67 61.25,32.63 U1.31
USART1_TX: length 33.9
  TOP w0.254: U1.30 61.78,32.63 61.8,32.65 61.8,33.38 59.52,35.67 52.91,35.67 52.41,36.18 52.41,44.05 52.91,44.56 59.52,44.56 J12.1
USART2_RX: length 11.7
  TOP w0.254: J13.2 73.91,23.06 72.01,23.06 71.37,22.41 71.37,21.36 70.1,20.09 69.3,20.09 69.28,20.08 68.25,20.08 67.65,20.68 67.61,20.68 67.45,20.84 65.95,20.84
USART2_TX: length 10.5
  TOP w0.254: J13.1 72.47,20.85 71.34,19.71 69.46,19.71 69.44,19.7 65.62,19.7 65.1,20.22 64.77,20.22 64.5,19.95 U1.12
N13546: length 11.4
  TOP w0.254: 47.34,41.19 47.34,45.55 J8.1 46.31,45.49 46.7,45.1 U5.2
N13563: length 11.3
  TOP w0.254: U5.6 44.09,45.16 43.77,45.49 J8.2 44.74,45.61 44.74,41.19
N13598: length 15.2
  TOP w0.254: U5.8 42.8,44.39 42.5,44.69 40.76,44.69 39.96,45.49 J9.1 41.23,45.32 42.5,45.32 43.45,44.38 43.45,41.19
N13619: length 14.5
  TOP w0.254: 40.84,41.19 40.84,43.8 39.33,45.32 38.69,45.32 J9.2 37.42,45.32 38.05,44.69 39.33,44.69 40.2,43.81 U5.12
N15223: length 14.9
  TOP w0.254: 40.84,8.81 40.84,6.2 39.96,5.32 39.33,5.32 J10.1 37.42,5.32 38.05,5.95 39.96,5.95 40.2,6.18 U6.1
N15263: length 15.2
  TOP w0.254: U6.5 42.8,5.61 42.5,5.32 40.85,5.32 40.59,5.06 40.51,5.06 39.96,4.51 J10.2 41.23,4.68 42.5,4.68 43.45,5.62 43.45,8.81
N15407: length 11.3
  TOP w0.254: U6.8 44.74,4.39 J11.1 43.77,4.51 44.09,4.84 U6.7
N15519: length 11.4
  TOP w0.254: 47.34,8.81 47.34,4.45 J11.2 46.31,4.51 46.7,4.9 U6.11
N31972: length 5
  TOP w0.5: U3.8 29.16,7.22 29.8,7.86 31.45,7.86 31.51,7.79 C12.2
N31979: length 26.4
  TOP w0.5: C12.1 29.73,9.19 29.16,9.76 29.16,11.99 30.11,12.94 30.61,12.94 31.11,13.44 31.11,16.11 29.22,18 28.75,18 27.14,19.62 D3.1 27.14,23.85 24.95,26.04 L1.1
N32592: length 3
  TOP w0.5: 26.74,2.77 26.74,3.59 26.62,3.7 U3.6
N32821: length 9.3
  TOP w0.254: 27.89,11.26 27.89,10.53 27.13,9.76 24.72,9.76 24.2,9.24 22.18,9.24 R6.2
N35796: length 5.4
  TOP w0.5: 26.62,11.26 26.62,12.65 27.54,13.57 28.79,13.57 29.23,14.01 C17.1
N36210: length 2.4
  TOP w0.5: C17.2 R9.2
N38494: length 17.5
  TOP w0.254: R8.2 R10.1 31.55,17.41 v1(32.34,16.62) ; v1(24.72,13.32) 24.72,12.63 25.36,11.99 25.36,11.26
  BOTTOM w0.254: v1(32.34,16.62) 25.74,16.62 24.72,15.6 v1(24.72,13.32)
N053341: length 6.9
  TOP w0.254: R1.2 60.16,3.38 58.67,1.89 56.09,1.89 J2.4
N053344: length 6.7
  TOP w0.254: J2.3 55.84,7.22 58.93,7.22 60.16,5.98 R2.1
N066431: length 3.2
  TOP w0.254: R3.1 70.96,13.55 70.96,13.55 70.96,14.21
N066591: length 3.2
  TOP w0.254: D2.1 49.37,28.79 49.37,28.79 R4.1
N113201: length 11
  TOP w0.5: 13.89,21.82 13.89,30.27 14.4,30.78 U2.2
N288331: length 14.4
  TOP w0.5: F1.1 2.55,16.16 3.77,17.38 7.58,17.38 8.88,18.69 8.88,21.82

## Copper pours and planes (outline as drawn; the poured copper is in the pictures)
GND on TOP, GND: 0.5,47 1.23,48.77 3,49.5 82,49.5 83.77,48.77 84.5,47 84.5,3 83.77,1.23 82,0.5 3,0.5 1.23,1.23 0.5,3
